# Altium PCB Linear Charge PCB.PcbDoc
Units mm, origin at the board's own origin, x right, y up, seen from the top; angles counter-clockwise.
Board outline 49.75 x 42.5 mm, 2 copper layers (Top Layer, Bottom Layer); 47 components, 40 nets, 177 pads, 33 vias.
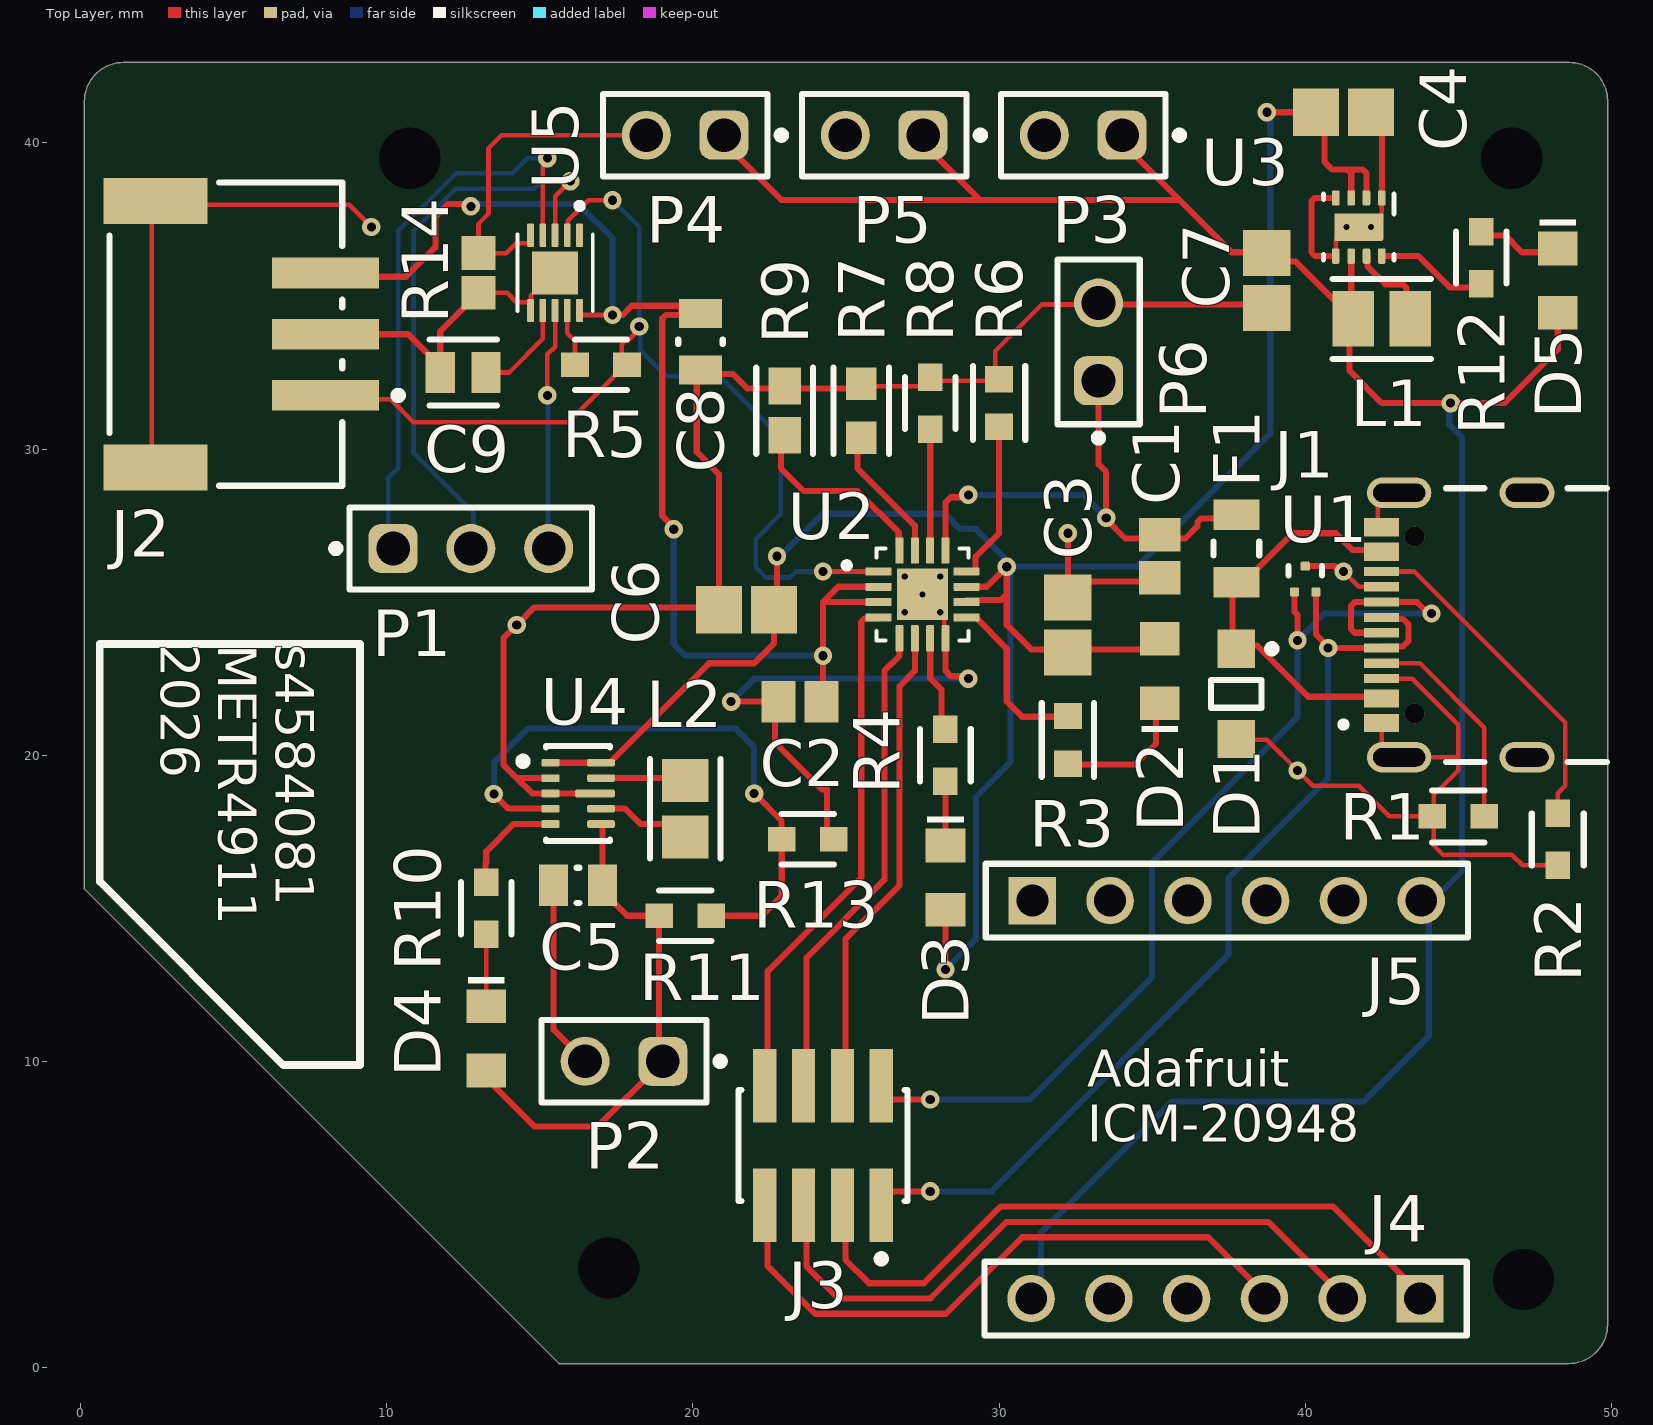
[diagram p0: Top Layer view]
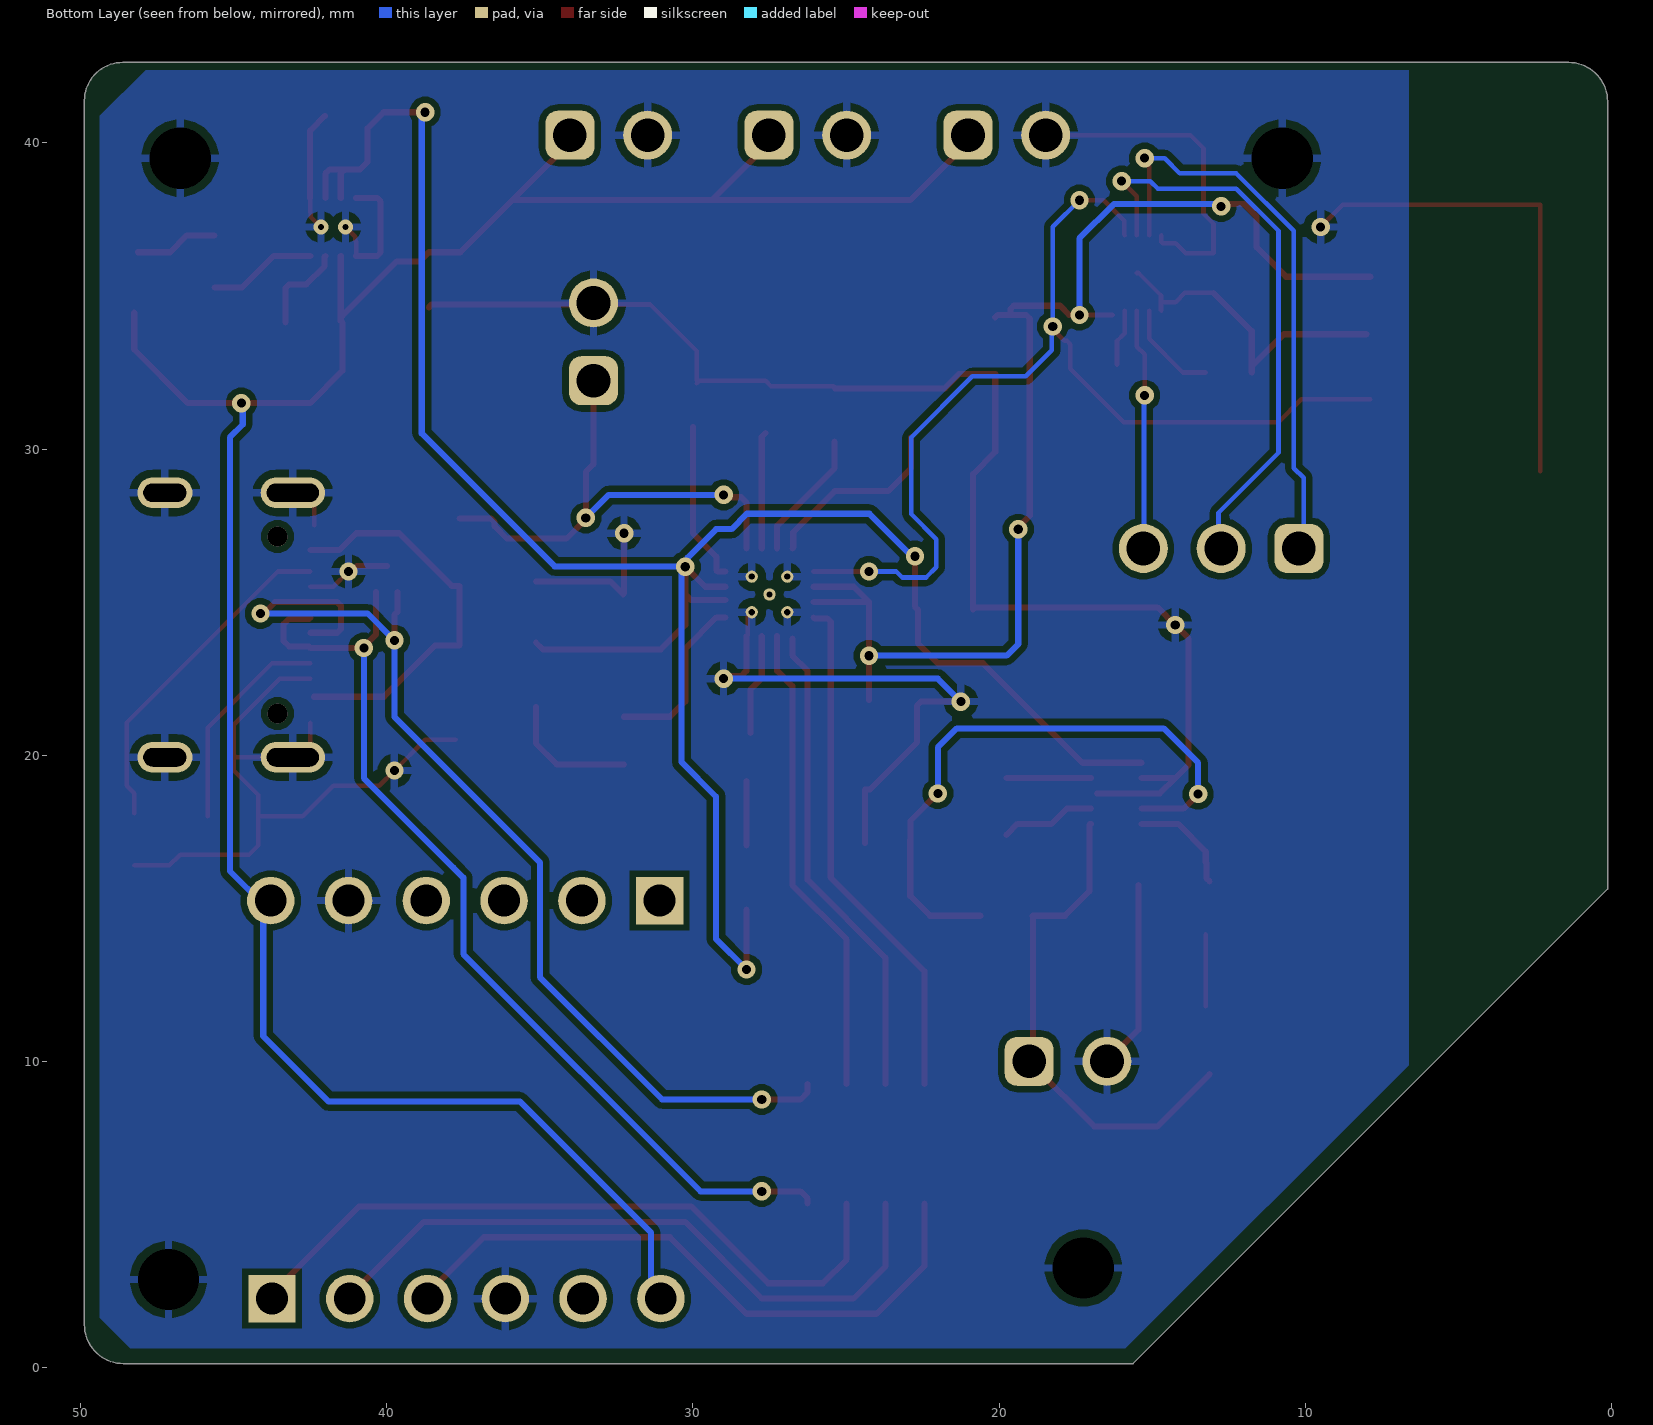
[diagram p1: Bottom Layer view, seen from below]
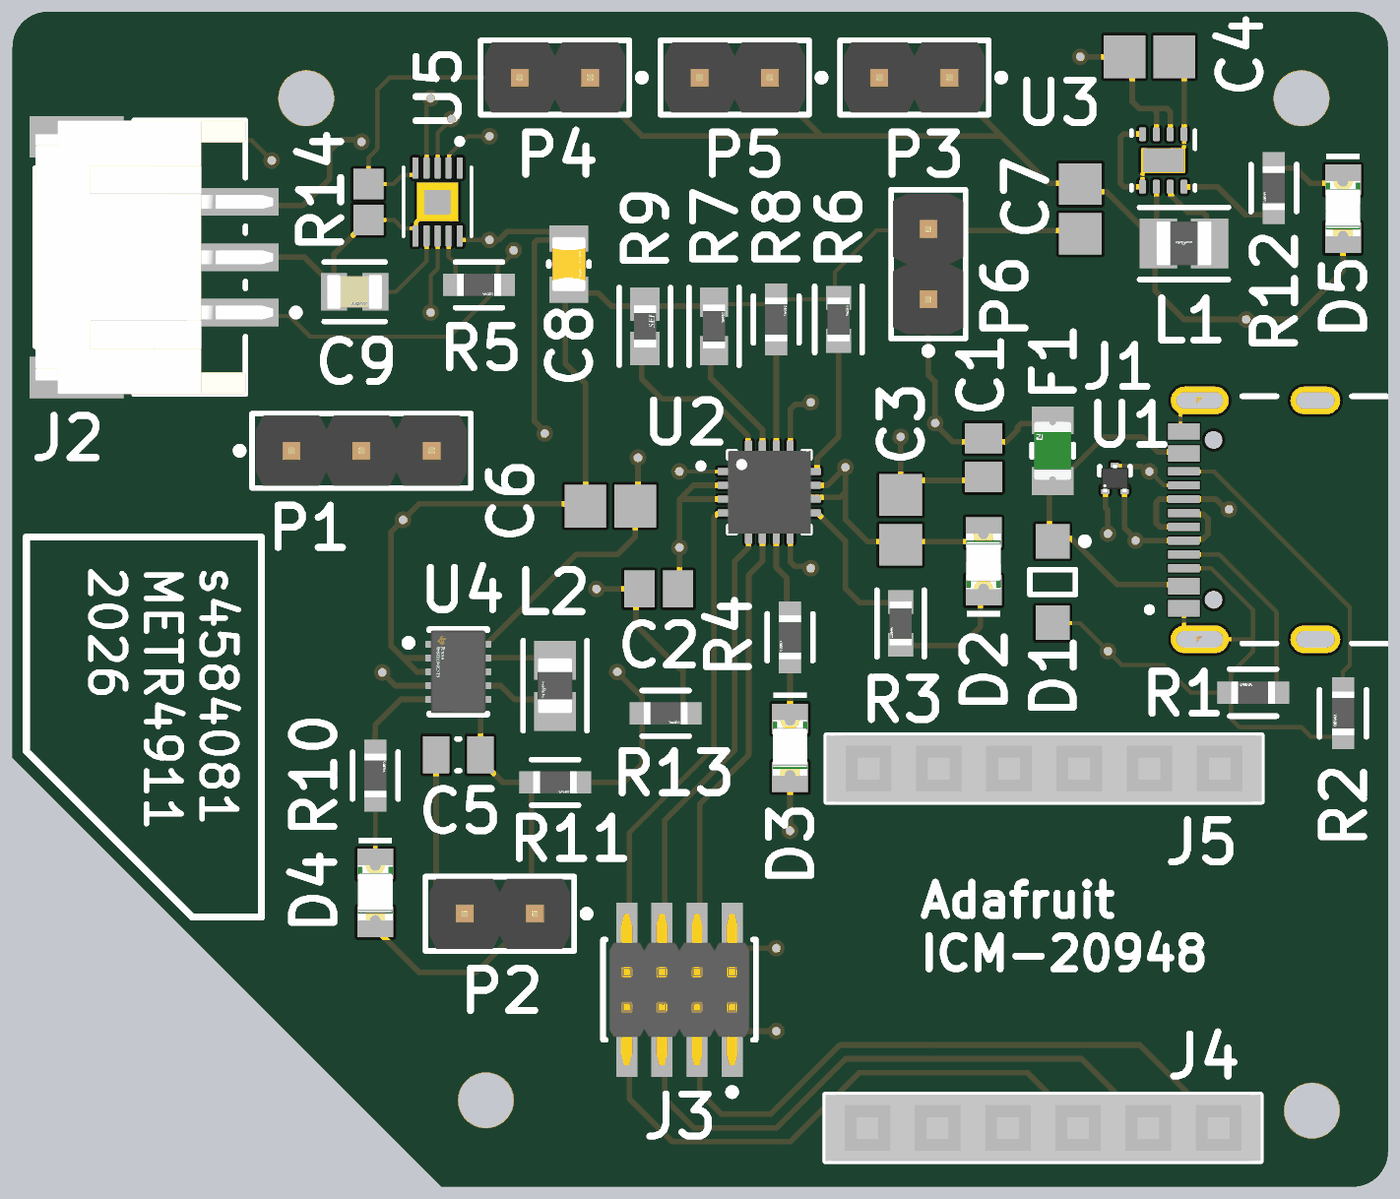
[diagram p2: 3D render of the assembled board from above, using the file's embedded part models]

## Layer stack, top to bottom
Top Solder: solder mask 0.0102, Solder Resist, Dk 3.5
Top Layer: signal copper 0.0356
Dielectric 1: dielectric 0.32, FR-4, Dk 4.8
Bottom Layer: signal copper 0.0356
Bottom Solder: solder mask 0.0102, Solder Resist, Dk 3.5

## Board outline
0.127,15.627 0.127,41.357 cw(c1.397,41.357) 1.397,42.627 48.627,42.627 cw(c48.627,41.377) 49.877,41.377 49.877,1.397 cw(c48.607,1.397) 48.607,0.127 15.627,0.127

## Design rules (kind name [scope] priority, off if disabled: settings)
Clearance [All] p1: gap=0.2 ignorepadtopadclearanceinfootprint=TRUE
HoleSize [IsVia] p1: absolutevalues=TRUE maxlimit=2.54 minlimit=0.025 maxpercent=80.000 minpercent=20.000
PolygonConnect [All] p1: connectstyle=Relief reliefconductorwidth=0.254 reliefentries=4 polygonreliefangle="90 Angle" airgapwidth=0.254
RoutingVias [All] p1: holewidth=0.3 width=0.4 viastyle="Through Hole" minholewidth=0.2 minwidth=0.3 maxholewidth=0.4 maxwidth=0.5
SilkToSolderMaskClearance [IsPad] p1: minsilkscreentomaskgap=0.2 clearancetoexposedcopper=TRUE
SolderMaskExpansion [All] p1: expansion=0.102 istentingtop=FALSE
Width [All] p1: maxlimit=0.2 minlimit=0.15 preferedwidth=0.2
28 further rules are at their usual default settings.

## Classes and differential pairs
component class "Voltage Regs": C4 C5 C6 C7 D4 D5 L1 L2 R10 R11 R12 R13 U3 U4
component class "IO Connections V1": D1 F1 J1 J2 J3 J4 J5 P1 P2 P3 P4 P5 P6 R1 R2 U1
component class "Charge Managment ICs": C1 C2 C3 C8 C9 D2 D3 R3 R4 R5 R6 R7 R8 R9 R14 U2 U5

## Components (designator, comment, footprint, x,y, rotation, side; value= is the part's Value field where it differs from the comment)
C1 "1uF 10% 0805" CAPC2013X100X50LL20T25 35.25,26.5 r270 top
C2 "1uF 10% 0805" CAPC2013X100X50LL20T25 23.5,21.75 r0 top
C3 "4.7uF 10% 0805" CAPC2013X145X50ML20T25 32.25,24.25 r270 top
C4 "10uF 10% 0805" CAPC2013X145X50ML20T25 41.25,41 r0 top
C5 "22uF 10% 0805" CAPC0805(2012)145_L 16.25,15.75 r180 top value=22uF
C6 "10uF 10% 0805" CAPC2013X145X50ML20T25 21.75,24.75 r0 top
C7 "10uF 10% 0805" CAPC2013X145X50ML20T25 38.75,35.5 r90 top
C8 "0.1uF 10% 0805" FP-AC0805-0_85-MFG 20.25,33.5 r90 top value="100 nF"
C9 "0.47uF 10% 0805" FP-C0805C-DN-MFG 12.5,32.5 r180 top value="0.47 μF"
D1 "SMF5.0AT1G" ONSC-SOD-123FL-2-498_V 37.75,22 r270 top
D2 "YELLOW 100mA 0805" WL-SMCW_0805_150080xx75000 35.25,22.75 r90 top
D3 "GREEN 100mA 0805" WL-SMCW_0805_150080xx75000 28.25,16 r270 top
D4 "RED 100mA 0805" WL-SMCW_0805_150080xx75000 13.25,10.75 r270 top
D5 "RED 100mA 0805" WL-SMCW_0805_150080xx75000 48.25,35.5 r270 top
F1 "0805L050WR" FP-0805L-MFG 37.75,26.75 r90 top value=0.15-0.85Ω
J1 "USB4105-GF-A" GCT_USB4105-GF-A 47.25,24.25 r90 top
J2 "S3B-PH-SM4-TB(LF)(SN)" FP-S3B-PH-SM4-TB_LF_SN-MFG 4.75,33.75 r90 top
J3 "20021121-00008C4LF" FP-20021121-00008C4LF-MFG 24.25,7.25 r180 top
J4 "SSW-106-02-T-S" SMTC-SSW-106-02-X-S 43.75,2.25 r180 top
J5 "SSW-106-02-T-S" SMTC-SSW-106-02-X-S 31.09,15.25 r0 top
L1 "2.2uH 20% 0805" FP-DFE2016CKA-IPC_A 42.5,34.25 r180 top
L2 "0.47uH 20% 0805" FP-LQM21PN_CH-w1_5-IPC_A 19.75,18.25 r270 top
P1 "61300311121" 61300311121 12.75,26.75 r0 top
P2 "61300211121" 61300211121 17.75,10 r180 top
P3 "61300211121" 61300211121 32.75,40.25 r180 top
P4 "61300211121" 61300211121 19.75,40.25 r180 top
P5 "61300211121" 61300211121 26.25,40.25 r180 top
P6 "61300211121" 61300211121 33.25,33.5 r90 top
R1 "5.1K 1% 0603" FP-AF0603-MFG 45,18 r180 top
R2 "5.1K 1% 0603" FP-AF0603-MFG 48.25,17.25 r270 top
R3 "30 Ohm 1% 0603" FP-AC0603-IPC_B 32.25,20.5 r270 top
R4 "18 Ohm 1% 0603" FP-AC0603-MFG 28.25,20 r270 top
R5 "10K 1% 0603" FP-AC0603-MFG 17,32.75 r0 top
R6 "1.1K 1% 0603" FP-AC0603-IPC_B 30,31.5 r90 top
R7 "2.94K 1% 0603" FP-AC0603-IPC_A 25.5,31.25 r90 top
R8 "56KΩ 1% 0603" FP-AC0603-MFG 27.75,31.5 r90 top
R9 "887 1% 0603" FP-RMCF0603-IPC_A 23,31.25 r90 top
R10 "18 Ohm 1% 0603" FP-AC0603-MFG 13.25,15 r90 top
R11 "66.5K 1% 0603" FP-AC0603-MFG 19.75,14.75 r0 top
R12 "13 Ohm 1% 0603" FP-AC0603-MFG 45.75,36.25 r270 top
R13 "10K 1% 0603" FP-AC0603-MFG 23.75,17.25 r0 top
R14 "20m 1% 0603" RESC1508X46X38ML25T25 13,35.75 r270 top
U1 "TPD2EUSB30DRTR" DRT0003A 40,25.75 r90 top
U2 "BQ24074RGTR" QFN50P300X300X100-17N 27.5,25.25 r0 top
U3 "TPS62162DSGT" DSG0008A_V 41.75,37.25 r270 top
U4 "TPS63802DLAR" FP-DLA0010A-MFG 16.25,18.75 r0 top
U5 "MAX17055ETB+T" SON40P200X250X80-11N 15.5,35.75 r270 top

## Footprints (in the part's own frame and the unit in brackets; to place one, negate y for a bottom-side part, rotate by r counter-clockwise, add the part's x,y. Pads: shape width x height; smd on the part's side, far side on the other; paste and mask are expansions set on the pad)
61300211121 [mm] "Pin Header, pitch 2.54 mm, THT, Vertical, single row, 2p"
  rrect50% 1.6x1.6 hole 1.1: 1(-1.27,0)
  round 1.6 hole 1.1: 2(1.27,0)
  silkscreen extent -3.26,-1.35 2.69,1.35, body extent -2.54,-1.27 2.54,1.27, height 8.57
61300311121 [mm] "Pin Header, pitch 2.54 mm, THT, Vertical, single row, 3p"
  rrect50% 1.6x1.6 hole 1.1: 1(-2.54,0)
  round 1.6 hole 1.1: 2(0,0) 3(2.54,0)
  silkscreen extent -4.53,-1.35 3.96,1.35, body extent -3.81,-1.27 3.81,1.27, height 8.57
CAPC0805(2012)145_L [mm] "Chip Capacitor, Body 2.0x1.2mm, Height 1.45mm, IPC High Density"
  rect 0.95x1.35 smd: 1(-0.8,0) 2(0.8,0)
  silkscreen extent -0.05,-0.58 0.05,0.58, body extent -1.1,-0.72 1.1,0.72, height 1.45
CAPC2013X100X50LL20T25 [mm] "Chip Capacitor, 2-Leads, Body 2.00x1.25mm, IPC High Density"
  rect 1.1x1.35 smd: 1(-0.7,0) 2(0.7,0)
  body extent -1.1,-0.72 1.1,0.72, height 1
CAPC2013X145X50ML20T25 [mm] "Chip Capacitor, 2-Leads, Body 2.00x1.25mm, IPC Low Density"
  rect 1.5x1.55 smd: 1(-0.9,0) 2(0.9,0)
  body extent -1.1,-0.72 1.1,0.72, height 1.45
DRT0003A [mm] "SOTFL, 3-Leads, Body 1x1mm (inc leads), Pitch 0.35mm"
  rrect33% 0.3x0.3 smd: 1(-0.425,0.35) 2(-0.425,-0.35) 3(0.425,0)
  silkscreen extent 0.13,-0.55 0.43,0.55, body extent -0.5,-0.5 0.5,0.5, height 0.5
DSG0008A_V [mm] "SON, 8-Leads, Body 2x2mm, Pitch 0.5mm, Thermal Pad 1.6x0.9mm, TI Recommended"
  rrect40% 0.5x0.25 smd: 1(-0.95,0.75) 2(-0.95,0.25) 3(-0.95,-0.25) 4(-0.95,-0.75) 5(0.95,-0.75) 6(0.95,-0.25) 7(0.95,0.25) 8(0.95,0.75)
  rrect11% 0.9x1.6 smd paste-0.45: 9(0,0)
  silkscreen extent -1.07,-1.15 1.07,1.15, body extent -1.05,-1.05 1.05,1.05, height 0.8
FP-0805L-MFG [mm]
  rect 1x1.5 smd paste+0 mask+0: 1(-1.1,0) 2(1.1,0)
  silkscreen extent -0.23,-0.75 0.23,0.75, body extent -1.7,-0.85 1.7,0.85, height 0.25
FP-20021121-00008C4LF-MFG [mm]
  rect 0.76x2.4 smd paste+0 mask+0: 1(-1.905,1.95) 2(-1.905,-1.95) 3(-0.635,1.95) 4(-0.635,-1.95) 5(0.635,1.95) 6(0.635,-1.95) 7(1.905,1.95) 8(1.905,-1.95)
  silkscreen extent -2.77,-1.82 2.77,3.82, body extent -2.87,-3.25 2.87,3.25, height 0.25
FP-AC0603-IPC_A [mm]
  rect 1.059x1.012 smd paste+0 mask+0: 1(-0.877,0) 2(0.877,0)
  silkscreen extent -1.41,-0.91 1.41,0.91, body extent -1.91,-1.01 1.91,1.01, height 0.25
FP-AC0603-IPC_B [mm]
  rect 0.859x0.912 smd paste+0 mask+0: 1(-0.777,0) 2(0.777,0)
  silkscreen extent -1.21,-0.86 1.21,0.86, body extent -1.46,-0.71 1.46,0.71, height 0.25
FP-AC0603-MFG [mm]
  rect 0.9x0.8 smd paste+0 mask+0: 1(-0.85,0) 2(0.85,0)
  silkscreen extent -0.85,-0.82 0.85,0.82, body extent -1.4,-0.55 1.4,0.55, height 0.25
FP-AC0805-0_85-MFG [mm]
  rect 0.95x1.4 smd paste+0 mask+0: 1(-0.925,0) 2(0.925,0)
  silkscreen extent -0.08,-0.72 0.08,0.72, body extent -1.6,-1.05 1.6,1.05, height 0.25
FP-AF0603-MFG [mm]
  rect 0.9x0.8 smd paste+0 mask+0: 1(-0.85,0) 2(0.85,0)
  silkscreen extent -0.85,-0.85 0.85,0.85, body extent -1.4,-0.55 1.4,0.55, height 0.25
FP-C0805C-DN-MFG [mm]
  rect 0.95x1.35 smd paste+0 mask+0: 1(-0.75,0) 2(0.75,0)
  silkscreen extent -1.1,-1.07 1.1,1.07, body extent -1.4,-0.85 1.4,0.85, height 0.25
FP-DFE2016CKA-IPC_A [mm]
  rect 1.358x1.812 smd paste+0 mask+0: 1(-0.927,0) 2(0.927,0)
  silkscreen extent -1.61,-1.31 1.61,1.31, body extent -2.11,-1.41 2.11,1.41, height 0.25
FP-DLA0010A-MFG [mm]
  rrect40% 0.6x0.25 smd paste+0 mask+0: 1(-0.9,1) 2(-0.9,0.5) 3(-0.9,0) 4(-0.9,-0.5) 5(-0.9,-1)
  rrect40% 0.9x0.25 smd paste+0 mask+0: 6(0.75,-1) 7(0.75,-0.5) 9(0.75,0.5) 10(0.75,1)
  rrect40% 1.3x0.25 smd paste-1000 mask+0: 8(0.55,0)
  silkscreen extent -1.92,-1.55 1.05,1.55, body extent -1.3,-1.65 1.3,1.65, height 0.25
FP-LQM21PN_CH-w1_5-IPC_A [mm]
  rect 1.406x1.508 smd paste+0 mask+0: 1(-0.926,0) 2(0.926,0)
  silkscreen extent -1.63,-1.15 1.63,1.15, body extent -2.13,-1.25 2.13,1.25, height 0.25
FP-RMCF0603-IPC_A [mm]
  rect 1.206x1.058 smd paste+0 mask+0: 1(-0.801,0) 2(0.801,0)
  silkscreen extent -1.4,-0.93 1.4,0.93, body extent -1.9,-1.03 1.9,1.03, height 0.25
FP-S3B-PH-SM4-TB_LF_SN-MFG [mm]
  rect 1x3.5 smd paste+0 mask+0: 1(-2,-3.25) 2(0,-3.25) 3(2,-3.25)
  rect 1.5x3.4 smd paste+0 mask+0: 4(-4.35,2.3) 5(4.35,2.3)
  silkscreen extent -4.95,-5.75 4.95,3.8, body extent -5.2,-5.1 5.2,4.1, height 0.25
GCT_USB4105-GF-A [mm]
  rect 0.6x1.15 smd mask+0.05: A1_B12(-3.2,4.755) A4_B9(-2.4,4.755) B1_A12(3.2,4.755) B4_A9(2.4,4.755)
  rect 0.3x1.15 smd mask+0.05: A5(-1.25,4.755) A6(-0.25,4.755) A7(0.25,4.755) A8(1.25,4.755) B5(1.75,4.755) B6(0.75,4.755) B7(-0.75,4.755) B8(-1.75,4.755)
  oval 1x2.1 hole 0.6 slot 1.7 at 90 deg: SH1(-4.32,4.18) SH2(4.32,4.18)
  oval 1x1.8 hole 0.6 slot 1.4 at 90 deg: SH3(-4.32,0) SH4(4.32,0)
  round 0.65 hole 0.65 unplated: ""(-2.89,3.68) ""(2.89,3.68)
  silkscreen extent -4.47,-2.6 4.47,6.1
ONSC-SOD-123FL-2-498_V [mm] "SOD, 2-Leads, Body 2.7x1.65mm"
  rect 1.25x1.22 smd: 1(-1.475,0) 2(1.475,0)
  silkscreen extent -1.6,-0.82 0.45,1.29, body extent -1.35,-0.82 1.35,0.82, height 0.98
QFN50P300X300X100-17N [mm]
  rrect25% 0.86x0.26 smd: 1(-1.435,0.75) 2(-1.435,0.25) 3(-1.435,-0.25) 4(-1.435,-0.75) 9(1.435,-0.75) 10(1.435,-0.25) 11(1.435,0.25) 12(1.435,0.75)
  rrect25% 0.26x0.86 smd: 5(-0.75,-1.435) 6(-0.25,-1.435) 7(0.25,-1.435) 8(0.75,-1.435) 13(0.75,1.435) 14(0.25,1.435) 15(-0.25,1.435) 16(-0.75,1.435)
  rect 1.68x1.68 smd paste-0.31: 17(0,0)
  round 0.4 hole 0.2 mask+0: 18(0,0) 19(-0.58,0.58) 20(0.58,0.58) 21(-0.58,-0.58) 22(0.58,-0.58)
  silkscreen extent -2.57,-1.5 1.5,1.5, body extent -1.5,-1.5 1.5,1.5, height 1
RESC1508X46X38ML25T25 [mm] "Chip Resistor, 2-Leads, Body 1.52x0.76mm, IPC Low Density"
  rect 1.1x1.1 smd: 1(-0.65,0) 2(0.65,0)
  body extent -0.89,-0.51 0.88,0.5, height 0.46
SMTC-SSW-106-02-X-S [mm] "SQ Post Socket, 1x6 Pins, Vertical, 2.54mm Pitch, Female"
  rect 1.55x1.55 hole 1.04: 1(0,0)
  round 1.55 hole 1.04: 2(2.54,0) 3(5.08,0) 4(7.62,0) 5(10.16,0) 6(12.7,0)
  silkscreen extent -1.53,-1.2 14.23,1.2, body extent -1.52,-1.21 14.22,1.21, height 8.51
SON40P200X250X80-11N [mm]
  rrect25% 0.76x0.22 smd: 1(-1.23,0.8) 2(-1.23,0.4) 3(-1.23,0) 4(-1.23,-0.4) 5(-1.23,-0.8) 6(1.23,-0.8) 7(1.23,-0.4) 8(1.23,0) 9(1.23,0.4) 10(1.23,0.8)
  rect 1.4x1.5 smd paste-2: 11(0,0)
  silkscreen extent -2.29,-1.23 1.25,1.23
WL-SMCW_0805_150080xx75000 [mm] "SMD Mono-color Chip LED, body 2.0x1.25mm"
  rect 1.1x1.3 smd: 1(-1.05,0) 2(1.05,0)
  silkscreen extent -2,-0.6 -1.8,0.6, body extent -1,-0.63 1,0.62, height 0.7

## Part data
C1 C2: library part CMP-1036-04732-2, Manufacturer=Kemet, Part Number=C0805C105K9RACTU
C3: library part CMP-2007-01048-1, Manufacturer=Kemet, Part Number=C0805C475K4RACTU
C4 C6 C7: library part CMP-2007-01044-1, Manufacturer=Kemet, Part Number=C0805C106K8RACTU
C5: library part CMP-1036-04938-1, "CAP 22uF 6.3V ±10% 0805 (2012 Metric) Thickness 1.45mm SMD", Case-EIA=0805, Case-Metric=2012, Rated Voltage="6.3 V", Tolerance=Â±10%, Max Thickness="1.45 mm", Technology=SMT
C8: library part CMP-03422-000831-1, "AC0805 100 nF X7R 10.00% 50 V", Capacitance="100 nF", Manufacturer=Yageo, Manufacturer Part Number=AC0805KKX7R9BB104, Package=AC0805-0.85, Temperature="-55°C to +125°C", Temperature Characteristic=X7R, Temperature Coefficient=15%, Temperature Range High=+125°C, Temperature Range Low=-55°C, Tolerance=0.1, Voltage Rating="50 V", Automotive=Yes, Automotive Grade="Grade 1", Category=Cap, ComponentLink2Description=Datasheet, ComponentLink2URL=http://www.yageo.com/documents/recent/UPY-AC_NP0X7R_16V-to-630V_12.pdf, Device Class L1="Passive Components", Device Class L2=Capacitors, Device Class L3="Ceramic Capacitors", Footprint Url=http://www.yageo.com/exep/pages/download/literatures/UPY-C_GEN_24.pdf, Height=0.95mm, Ipc Land Pattern Name=CAPC200125X85, Lead Free=Yes, Material=Ceramic, Octopart=https://octopart.com/ac0805kkx7r9bb104-yageo-90326560, RoHS=TRUE
C9: library part CMP-1036-04645-2, "CAP CER 0.47UF 25V X7R 0805", Capacitance="0.47 μF", Manufacturer=KEMET, Manufacturer Part Number=C0805C474K3RACTU, Package=C0805C-DN, Temperature="-55°C to +125°C", Temperature Characteristic=X7R, Temperature Coefficient=30ppm/°C, Temperature Range High=+125°C, Temperature Range Low=-55°C, Tolerance=0.1, Voltage Rating="25 V", Automotive=No, Category=Cap, ComponentLink2Description=Datasheet, ComponentLink2URL=https://content.kemet.com/datasheets/KEM_C1003_C0G_SMD.pdf, Device Class L1="Passive Components", Device Class L2=Capacitors, Device Class L3="Ceramic Capacitors", Digikey Description="CAP CER 0.47UF 25V X7R 0805", Height=0.88mm, Ipc Land Pattern Name=CAPC200125X78, Lead Free=Yes, Material=Ceramic, Octopart=https://octopart.com/c0805c474k3ractu-kemet-90785, RoHS=TRUE
D1: library part CMP-1061-00612-1, "200 W Transient Voltage Suppressor, 2-Pin SOD-123FL, Pb-Free, Tape and Reel", Manufacturer="On Semiconductor", ComponentLink1Description="Manufacturer URL", ComponentLink1URL=http://www.onsemi.com/, ComponentLink2Description=Datasheet, ComponentLink2URL=http://www.onsemi.com/pub_link/Collateral/SMF5.0AT1-D.PDF, ComponentLink3Description="Package Specification", ComponentLink3URL=http://www.onsemi.com/pub_link/Collateral/498-01.PDF, DatasheetVersion="Rev. 7", Direction=Unidirectional, IR Max (uA)=400, Mounting Technology="Surface Mount", PackageDescription="2-Pin SOD, Body 1.65 x 2.7 mm", PackageReference=SOD-123FL-2-498, PackageVersion="Rev. D, 05/2013", Packing="Tape and Reel", PartNumber=SMF5.0AT1G, RoHS=Pb-Free, V(BR) Typ (V)=6.7
D2: library part CMP-1426-00012-4, "2 V Yellow LED 2012 (0805) SMD, Wurth Elektronik WL-SMCW 150080YS75000", Case Code (Imperial)=0805, Case Code (Metric)=2012, Color=Yellow, Forward Current=100mA, Forward Voltage=2V, Manufacturer Lifecycle Status=ACTIVE, Manufacturer Package Identifier="0805 (2012 metric)", Max Junction Temperature (Tj)=95°C, Max Operating Temperature=85°C, Max Reverse Voltage (DC)=5V, Min Operating Temperature=-40°C, Power Dissipation=72mW, Test Current=20mA, Case/Package=0805, Dominant Wavelength=590nm, Height=700µm, Length=2mm, Lens Style="Clear, Rectangular", Lifecycle Status=Production, Luminous Intensity=120mcd, Mount="Surface Mount", Packaging="Tape and Reel", Peak Wavelength=595nm, REACH SVHC=Unknown, Reverse Voltage=5V, RoHS=Compliant, Viewing Angle=140°, Wavelength=590nm, Width=1.25mm, YEOL="1 = Estimated lifetime > 10 years"
D3: library part CMP-1426-00007-4, "WURTH ELEKTRONIK - 150080GS75000 - LED, Green, SMD, 0805, 30 mA, 3.2 V, 520 nm", Case Code (Imperial)=0805, Case Code (Metric)=2012, Color=Green, Forward Current=100mA, Forward Voltage=3.2V, Manufacturer Lifecycle Status=ACTIVE, Manufacturer Package Identifier="0805 (2012 metric)", Max Junction Temperature (Tj)=95°C, Max Operating Temperature=85°C, Max Reverse Voltage (DC)=5V, Min Operating Temperature=-40°C, Power Dissipation=105mW, Test Current=20mA, Case/Package=0805, Dominant Wavelength=525nm, Height=700µm, Length=2mm, Lens Style="Clear, Rectangular", Lifecycle Status=Production, Luminous Intensity=450mcd, Mount="Surface Mount", Packaging="Tape and Reel", Peak Wavelength=515nm, REACH SVHC=Unknown, Reverse Voltage=5V, RoHS=Compliant, Viewing Angle=140°, Wavelength=525nm, Width=1.25mm, YEOL="1 = Estimated lifetime > 10 years"
D4 D5: library part CMP-1426-00011-4, "LED Uni-Color Red 630nm 2-Pin Chip 0805(2012Metric) T/R", Case Code (Imperial)=0805, Case Code (Metric)=2012, Color=Red, Forward Current=100mA, Forward Voltage=2V, Manufacturer Lifecycle Status=ACTIVE, Manufacturer Package Identifier="0805 (2012 metric)", Max Junction Temperature (Tj)=95°C, Max Operating Temperature=85°C, Max Reverse Voltage (DC)=5V, Min Operating Temperature=-40°C, Power Dissipation=72mW, Test Current=20mA, Case/Package=0805, Dominant Wavelength=625nm, Height=700µm, Length=2mm, Lens Style="Clear, Rectangular", Lifecycle Status=Production, Luminous Intensity=150mcd, Mount="Surface Mount", Packaging="Tape and Reel", Peak Wavelength=630nm, REACH SVHC=Unknown, RoHS=Compliant, Viewing Angle=140°, Wavelength=625nm, Width=1.25mm, YEOL="1 = Estimated lifetime > 10 years"
F1: library part CMP-08606-000023-1, "PTC RESET FUSE 6V 500MA 0805", Ambient Temperature Range High=+85°C, Ambient Temperature Range Low=-40°C, Current Rating=100A, Hold Current=0.5A, Manufacturer="Littelfuse Inc.", Package=0805L, Resistance=0.15-0.85Ω, Temperature="-40°C to +85°C", Trip Current=1A, Voltage Rating=6V, Automotive=No, Category=Fuse, ComponentLink2Description=Datasheet, ComponentLink2URL=https://www.littelfuse.com/~/media/electronics/datasheets/resettable_ptcs/littelfuse_ptc_0805l_datasheet.pdf.pdf, Device Class L1="Circuit Protection", Device Class L2="PTC Resettable Fuses", Device Class L3=unset, Digikey Description="PTC RESET FUSE 6V 500MA 0805", Height=1.25mm, Lead Free=Yes, Manufacturer Part Number=0805L050WR, Mouser Description="PTC Resettable Fuse 0.5A(hold) 1A(trip) 6VDC 100A 0.5W 0.1s 0.15Ohm SMD Solder Pad 0805 T/R", Octopart=https://octopart.com/0805l050wr-littelfuse-673858, RoHS=TRUE, Temperature Range High=+85°C, Temperature Range Low=-40°C, Trip Time=0.1s
J1: Package=None, Availability=Unavailable, MF="{'manufacturer': u'GCT'}", MP=USB4105-GF-A, Price=None
J2: library part CMP-2000-07023-2, "CONN HEADER SMD R/A 3POS 2MM", Color=Natural, Contact Resistance=10mR, Current Rating=2A, Flammability Rating="UL94 V-0", Housing Color=Beige, Insulation Resistance=1GR, Max Operating Temperature=85°C, Max Voltage Rating (AC)=100V, Min Operating Temperature=-25°C, Connector Type=Header, Contact Finish - Mating=TIN, Contact Material="Copper Alloy", Contact Mating Length=0.13inch, Contact Plating=Tin, Contact Shape=Square, Contact Type="Male Pin", Depth=7.6mm, Fastening Type=Detent, Gender=Male, Height=9.4mm, Housing Material=Polyamide, Insulation Color=Natural, Insulation Material=Nylon, Lead Free="Lead Free", Lead Pitch=2mm, Length=9.9mm, Material=Polyamide, Max Current Rating=2A, Max Voltage Rating (DC)=100V, Mount="Surface Mount", Number of Contacts=3, Number of Poles=3, Number of Positions=3, Number of Rows=1, Orientation="Right Angle", Packaging="Tape and Reel", Pitch=2mm, REACH SVHC="No SVHC", Series=PH, Termination=Solder, Voltage Rating=100V, Voltage Rating (AC)=100V, Width=5mm, Working Voltage=100V
J3: library part CMP-15126-126517167-1, "20021121-00008C4LF Conn Unshrouded Header HDR 8 POS 1.27mm Solder ST Top Entry SMD Minitek127® T/R", Color=Black, Contact Resistance=30mΩ, Current Rating=1A, Max Operating Temperature=85°C, Max Voltage Rating (AC)=125V, Min Operating Temperature=-55°C, Connector Type="Header, Male Pin", Contact Material=Copper, Contact Mating Length=3.048mm, Contact Plating=Gold, Depth=3.4mm, Gender=Male, Height=5.05mm, Housing Color=Black, Housing Material=Thermoplastic, Length=5.08mm, Mating Post Length=3.05mm, Mount="Surface Mount", NexarPartId=126517167, Number of Contacts=8, Number of Pins=8, Number of Positions=8, Number of Rows=2, Orientation=Straight, Pitch=1.27mm, REACH SVHC="No SVHC", RoHS=Compliant, Row Spacing=1.27mm, Stack Height=3mm, Termination=Solder, Voltage Rating=125V
J4 J5: library part CMP-1023-00360-1, "SQ Post Socket, Through-hole, Vertical, -55 to 105 degC, 2.54mm Pitch, 6-Pin, Female, RoHS", Manufacturer=Samtec, Temperature Range="-55 to 105 degC", ComponentLink1Description="Manufacturer URL", ComponentLink1URL=http://www.samtec.com, ComponentLink2Description=Datasheet, ComponentLink2URL=http://www.samtec.com/documents/webfiles/pdf/SSW_TH.PDF, ComponentLink3Description="Package Specification", ComponentLink3URL=http://www.samtec.com/documents/webfiles/cpdf/SSW-1XX-XX-XXX-X-XX-XXX-XX-MKT.pdf, DatasheetVersion=F-214, Mounting Technology=Through-hole, Orientation=Vertical, PackageDescription="Assembly, Socket Strip .016 X .031 Tail", PackageReference=SSW-106-02-X-S, PackageVersion="CA, 6/1987", PartNumber=SSW-106-02-T-S, Pitch="2.54 mm", RoHS=True
L1: library part CMP-06042-016665-1, "Chip Inductors Wirewound Metal Alloy Shielding 0806 Package 2.2uH 20% 1MHz"
L2: library part CMP-06042-016314-1, "Multilayer Type Inductor for Power Lines, 2012, 0.47μH, 20%, 0.138Ω, 1.8A", RoHS Compliant=Yes
P1: library part CMP-1502-01062-4, "THT Vertical Pin Header WR-PHD, Pitch 2.54 mm, Single Row, 3 pins", Color=Black, Contact Resistance=20mΩ, Current Rating=3A, Max Operating Temperature=105°C, Min Operating Temperature=-40°C, Operating Supply Voltage=250V, Connector Type="Male Pin", Contact Material=Gold, Contact Mating Length=5.9944mm, Contact Plating=Gold, Gender=Male, Height=8.94mm, Lead Free="Lead Free", Lead Pitch=2.54mm, Mount="Through Hole", Number of Contacts=3, Number of Pins=3, Number of Positions=3, Number of Rows=1, Orientation=Vertical, Packaging=Bulk, Pitch=2.54mm, RoHS=Compliant, Termination=Solder, Voltage Rating=250V
P2 P3 P4 P5 P6: library part CMP-1712-00002-7, "THT Vertical Pin Header WR-PHD, Pitch 2.54 mm, Single Row, 2 pins", Color=Black, Contact Resistance=20mΩ, Current Rating=3A, Max Operating Temperature=105°C, Min Operating Temperature=-40°C, Operating Supply Voltage=250V, Connector Type="Male Pin", Contact Gender=Male, Contact Material=Gold, Contact Mating Length=5.9944mm, Contact Plating=Gold, Gender=Male, Height=8.94mm, Housing Material=PBT, Lead Free="Lead Free", Lead Pitch=2.54mm, Mount="Through Hole", Number of Contacts=2, Number of Pins=2, Number of Positions=2, Number of Rows=1, Orientation=Vertical, Packaging=Bulk, Pitch=2.54mm, REACH SVHC=No, RoHS=Compliant, Termination="Through Hole", Voltage Rating=250V
R1 R2: library part CMP-03412-041991-1, "Anti-Sulfurated Chip Resistors Automotive Grade 5.1kΩ 1% 100ppm/°C 0603", Case/Package=0603, Max Operating Temperature=155°C, Max Power Dissipation=100mW, Min Operating Temperature=-55°C, Resistance=5.1kR, Resistor Type="Thick Film", Temperature Coefficient=100ppm/°C, Tolerance=1%, Features="Moisture Resistant", Height=0.022inch, Length=0.063inch, Number of Terminations=2, Packaging="Tape and Reel", RoHS Compliant=Yes, Series=AF, Width=0.031inch
R3: library part CMP-03412-028950-2, "RES 30Ω 1.00% 0.1W 0603", Case/Package=0603, Max Operating Temperature=155°C, Max Power Dissipation=100mW, Min Operating Temperature=-55°C, Resistance=30R, Resistor Type="Thick Film", Temperature Coefficient=100ppm/°C, Tolerance=1%, Features="Moisture Resistant", Height=0.022inch, Length=0.063inch, Number of Terminations=2, Packaging="Tape and Reel", RoHS Compliant=Yes, Series=AC, Width=0.031inch
R4 R10: library part CMP-03412-005942-2, "RES 18Ω 1.00% 0.1W 0603", Case/Package=0603, Max Operating Temperature=155°C, Max Power Dissipation=100mW, Min Operating Temperature=-55°C, Resistance=18R, Resistor Type="Thick Film", Temperature Coefficient=100ppm/°C, Tolerance=1%, Depth=0.8mm, Features="Moisture Resistant", Height=0.022inch, Length=0.063inch, Military Standard=Not, Number of Terminations=2, Packaging="Tape and Reel", RoHS Compliant=Yes, Series=AC, Width=0.031inch
R5: library part CMP-03412-038110-1, "RES 10.5KΩ 1.00% 0.1W 0603", RoHS Compliant=Yes
R6: library part CMP-03412-029129-2, "RES 1.1KΩ 1.00% 0.1W 0603", Case Code (Imperial)=0603, Case Code (Metric)=1608, Max Operating Temperature=155°C, Max Power Dissipation=100mW, Min Operating Temperature=-55°C, Resistance=1.1kR, Resistor Type="Thick Film", Temperature Coefficient=100ppm/°C, Tolerance=1%, Voltage Rating=50V, Case/Package=0603, Features="Moisture Resistant", Height=0.022inch, Length=0.063inch, Number of Terminations=2, Packaging="Tape and Reel", Power Rating=100mW, RoHS Compliant=Yes, Series=AC, Termination=SMD/SMT, Width=0.8mm
R7: library part CMP-03412-000673-2, "RES 2.94KΩ 1.00% 0.1W 0603", Case Code (Imperial)=0603, Case Code (Metric)=1608, Max Operating Temperature=155°C, Max Power Dissipation=100mW, Min Operating Temperature=-55°C, Resistance=2.94kR, Resistor Type="Thick Film", Temperature Coefficient=100ppm/°C, Tolerance=1%, Voltage Rating=50V, Case/Package=0603, Features="Moisture Resistant", Height=0.022inch, Length=0.063inch, Number of Terminations=2, Packaging="Tape and Reel", Power Rating=100mW, RoHS Compliant=Yes, Series=AC, Termination=SMD/SMT, Weight=7.1E-05oz, Width=0.8mm
R8: library part CMP-03412-027575-2, "RES 56KΩ 1.00% 0.1W 0603", RoHS Compliant=Yes
R9: library part CMP-26527-006687-1, "887kΩ ±1% 0.1W 0603 Thick Film Chip Resistor AEC-Q200 compliant", Case/Package=0603, Max Operating Temperature=155°C, Min Operating Temperature=-55°C, Resistance=887kR, Resistor Type="Thick Film", Temperature Coefficient=100ppm/°C, Tolerance=1%, Contact Plating=Tin, Mount="Surface Mount", Packaging="Tape and Reel", Radiation Hardening=No, RoHS Compliant=Yes
R11: library part CMP-03412-000604-2, "RES 66.5KΩ 1.00% 0.1W 0603", Case Code (Imperial)=0603, Case Code (Metric)=1608, Max Operating Temperature=155°C, Max Power Dissipation=100mW, Min Operating Temperature=-55°C, Ratings=AEC-Q200, Resistance=66.5kR, Resistor Type="Thick Film", Temperature Coefficient=100ppm/°C, Tolerance=1%, Voltage Rating=50V, Case/Package=0603, Features="Moisture Resistant", Height=0.45mm, Length=1.6mm, Number of Terminations=2, Packaging="Tape and Reel", Power Rating=100mW, RoHS Compliant=Yes, Series=AC, Termination=SMD/SMT, Weight=7.1E-05oz, Width=0.8mm
R12: library part CMP-03412-014777-2, "RES 13Ω 1.00% 0.1W 0603", Case/Package=0603, Max Operating Temperature=155°C, Max Power Dissipation=100mW, Min Operating Temperature=-55°C, Resistance=13R, Resistor Type="Thick Film", Temperature Coefficient=100ppm/°C, Tolerance=1%, Features="Moisture Resistant", Height=0.022inch, Length=0.063inch, Number of Terminations=2, Packaging="Tape and Reel", RoHS Compliant=Yes, Series=AC, Width=0.031inch
R13: library part CMP-03412-038553-1, "RES 10kΩ 1.00% 0.2W 0603"
R14: library part CMP-2000-03802-1, Manufacturer="Vishay Dale", Part Number=WSL0603R0200FEA
U1: library part CMP-0326-00046-3, "ESD Solution for Super-Speed (6 Gbps) USB 3.0 Interface, 2 Channels, -40 to +85 degC, 3-pin SOT (DRT), Green (Rohs & No Sb/Br)", Breakdown Voltage(Min)(V)=9, Differential Capacitance(pF)=0.01, IO Capacitance(Typ)(pF)=0.7, IO Leakage Current(nA)=10, Manufacturer="Texas Instruments", 1394 / Firewire=TRUE, ComponentLink1Description=Datasheet, ComponentLink1URL=http://www.ti.com/general/docs/lit/getliterature.tsp?genericPartNumber=TPD2EUSB30&fileType=pdf, ComponentLink2Description="URL Link1", ComponentLink2URL=SamplesURL:http://www.ti.com/product/tpd2eusb30#samples, DatasheetVersion=SLVSAC2C, Eco-Plan="Green (RoHS & no Sb/Br)", HDMI=TRUE, IEC 61000-4-2 Air-Gap(+/- kV)=8, IEC 61000-4-2 Contact(+/- kV)=8, Mounting Technology="Surface Mount", PackageDescription="3-Flat Lead Plastic Small Outline, 1 x 1 mm (inc leads), 0.35 mm Pitch", PackageReference=DRT0003A, PackageVersion="revD, Jun-2008", PartNumber=TPD2EUSB30DRTR, Serial ATA / eSATA=TRUE, SubFamily="ESD Solution", USB Full Speed=TRUE, USB High Speed=TRUE, USB Super Speed=TRUE
U2: "Standalone 1-cell 1.5-A linear battery charger, Power Path, 4.2-V VBAT, 10.5-V OVP and 4.4-V VOUT", Package="VQFN-16 Texas Instruments", Check_prices=https://www.snapeda.com/parts/BQ24074RGTR/Texas+Instruments/view-part/?ref=eda, MF="Texas Instruments", MP=BQ24074RGTR, SnapEDA_Link=https://www.snapeda.com/parts/BQ24074RGTR/Texas+Instruments/view-part/?ref=snap
U3: library part CMP-0323-00319-3, "Buck Step Down Regulator with 3 to 17 V Input and 3.3 V Output, -40 to 85 degC, 8-Pin WSON (DSG), Green (RoHS & no Sb/Br)", Manufacturer="Texas Instruments", Rating=Catalog, Switch Current Limit(Typ)(A)=1.8, Code_JEDEC=MO-229, ComponentLink1Description=Datasheet, ComponentLink1URL=http://www.ti.com/general/docs/lit/getliterature.tsp?genericPartNumber=TPS62162&fileType=pdf, ComponentLink2Description="Package Specification", ComponentLink2URL=http://www.ti.com/litv/pdf/mpds308a, ComponentLink3Description="URL Link1", ComponentLink3URL="Samples URL:http://www.ti.com/product/tps54611#samples", DatasheetVersion=SLVSAM2A, Duty Cycle(Max)(%)=100, Eco-Plan="Green (RoHS & no Sb/Br)", Iout(Max)(A)=1, Iq(Typ)(mA)=0.017, Mounting Technology="Surface Mount", PackageDescription="8-Pin Plastic Small Outline No-Lead, 2 x 2 x 0.8 mm Body, 0.5 mm Pitch, Exposed Pad", PackageReference=DSG0008A, PackageVersion="revB, Oct-2010", PartNumber=TPS62162DSGT, Preset Vout(V)=3.3, Regulated Outputs(#)=1, SubFamily="Step-Down Regulator", Synchronous Rectification=TRUE, Topology=Buck, Vin(Max)(V)=17, Vin(Min)(V)=3, Vout(Max)(V)=3.3, Vout(Min)(V)=3.3
U4: library part CMP-04918-000005-1, "IC POWER MANAGEMENT", Manufacturer="Texas Instruments", Max Junction Temp=+125°C, Max Supply Voltage=5.5V, Min Supply Voltage=1.3V, Nominal Supply Current=11uA, Output Current=2A, Output Voltage=1.8-5.2V, Package=DLA0010A, Switching Frequency=1.4/1.6/2.1MHz, Temperature="-40°C to +125°C", Temperature Range Low=-40°C, Automotive=No, Category=IC, ComponentLink2Description=Datasheet, ComponentLink2URL=https://www.ti.com/lit/ds/symlink/tps63802.pdf, Device Class L1="Integrated Circuits (ICs)", Device Class L2="Power Management ICs", Device Class L3="Voltage Regulators - Switching", Digikey Description="IC POWER MANAGEMENT", Height=1mm, Lead Free=Yes, Manufacturer Part Number=TPS63802DLAR, Max Duty Cycle=100%, Mouser Description="2-A, high-efficient, 11-µA quiescent current buck-boost converter in QFN/DFN package 10-VSON-HR -40 to 125", Number Of Outputs=1, Octopart=https://octopart.com/tps63802dlar-texas+instruments-97359678, Output Type=AdjustableProgrammable, RoHS=TRUE, Standoff Height=0mm, Switching Topology=Buck-Boost, Temperature Range High=+125°C
U5: "Battery Battery Monitor IC Multi-Chemistry 10-TDFN (2.5x2)", Package=None, Availability="In Stock", Check_prices=https://www.snapeda.com/parts/MAX17055ETB+T/Maxim+Integrated/view-part/?ref=eda, MF="Maxim Integrated Products", MP=MAX17055ETB+T, Price=None, Purchase-URL=https://pricing.snapeda.com/search/part/MAX17055ETB+T/?ref=eda, SnapEDA_Link=https://www.snapeda.com/parts/MAX17055ETB+T/Maxim+Integrated/view-part/?ref=snap

## Free pads (board coordinates)
  round 1.524 hole 2: 3(47.127,2.877) 6(46.75,39.5) 7(10.75,39.5) MNT(17.25,3.25)

## Via types
v1: diameter 0.6, hole 0.3, Top Layer to Bottom Layer, 31 vias
v2: diameter 0.5, hole 0.2, Top Layer to Bottom Layer, 2 vias

## Nets (pads, with @x,y where several pads share a name; then routed paths per layer and width w, separated by ;. In a path a pad name is that pad's centre, name@x,y a point inside that pad or via, vN(x,y) a via of type N, cw(c..) or ccw(c..) an arc to the next point about the centre after c; other vN are vias at no path point)
3V3: C7.2 D5.2 J4.6 J5.6 L1.2 P3.1 P4.1 P5.1 U3.6 | length 79.8
  Top Layer w0.2: P4.1@21.387,39.637 22.897,38.127 29.387,38.127 ; P5.1@27.397,40.127 27.397,40.117 29.387,38.127 ; P3.1@33.897,40.127 33.981,40.127 34.535,39.573 34.535,39.489 37.597,36.427 38.627,36.427 38.927,36.127 39.677,36.127 L1.2@41.45,34.354 ; 35.877,38.127 29.387,38.127 ; U3.6@41.504,36.304 41.504,34.181 41.45,34.127 41.45,32.554 42.504,31.5 v1(44.75,31.5) 46.5,31.5 48.25,33.25 D5.2
  Bottom Layer w0.2: J4.6@31.377,2.127 31.377,4.414 35.656,8.693 41.906,8.693 44.037,10.824 44.037,15.127 45.127,16.217 45.127,30.377 44.704,30.8 44.704,31.454 v1(44.75,31.5)
3V8: C5.1 D4.2 P2.1 R11.1 U4.6 | length 16.6
  Top Layer w0.2: D4.2@13.127,9.577 14.827,7.877 16.897,7.877 18.897,9.877 18.897,14.747 18.904,14.754 17.854,14.754 17.054,15.554 17.054,15.754 17.054,17.729 17.029,17.754 U4.6@17.004,17.754
BATT+: C2.2 C8.2 J2.3 U2.2 U2.3 U5.10 | length 41.9
  Top Layer w0.15: U5.10@16.285,34.377 v1(17.377,34.377)
  Top Layer w0.2: J2.3@7.877,35.627 10.627,35.627 11.589,36.589 11.589,37.589 12,38 12.675,38 v1(12.75,37.925) ; v1(17.377,34.377) 17.711,34.377 18.011,34.677 19.527,34.677 19.627,34.577 C8.2@19.627,34.377 ; v1(19.377,27.377) 19.377,27.444 19,27.821 19,34.26 19.117,34.377 C8.2@19.627,34.377 ; C8.2@20.127,34.302 20.052,34.377 C8.2@19.627,34.377 ; C2.2@24.25,21.8 v1(24.25,23.25) 24.25,25 ; U2.3 24.25,25 ; U2.2 24.75,25.5 24.25,25
  Bottom Layer w0.2: v1(12.75,37.925) 12.825,38 16.254,38 17.377,36.877 v1(17.377,34.377) ; v1(19.377,27.377) 19.377,23.627 19.754,23.25 v1(24.25,23.25)
BATT-: C9.2 J2.2 R14.2 U5.6 U5.11 | length 11
  Top Layer w0.15: R14.2 13.932,35.1 14.235,34.797 14.665,34.797 14.7,34.763 U5.6 14.715,34.535 14.715,35.015 15.45,35.75 U5.11
  Top Layer w0.2: J2.2 10.7,33.75 C9.2@11.75,32.7 ; C9.2 C9.2@11.75,32.7 ; R14.2 11.75,33.85 C9.2@11.75,32.7
BATT_NTC: J2.1 R5.2 U2.1 U5.2 | length 34.6
  Top Layer w0.15: J2.1@7.877,31.627 10.127,31.627 10.877,30.877 15.927,30.877 17.677,32.627 17.677,33.427 17.783,33.533 17.868,33.533 18.25,33.915 v1(18.25,34) ; U5.2 15.915,36.995 15.915,37.458 16.584,38.127 v1(17.377,38.127) ; v1(24.25,26) U2.1
  Bottom Layer w0.15: v1(17.377,38.127) 18.25,37.254 v1(18.25,34) 18.279,33.971 18.279,33.225 19.127,32.377 20.877,32.377 22.877,30.377 22.877,27.877 22.052,27.052 22.052,26.139 22.389,25.802 23.16,25.802 23.358,26 v1(24.25,26)
CHG_OUT: C3.2 C4.1 C6.2 D2.2 D3.2 U2.10 U2.11 U3.2 U3.3 U4.1 U4.10 | length 74.2
  Top Layer w0.2: U4.1@15.354,19.754 17.004,19.754 17.279,19.754 20.529,23.004 22.004,23.004 22.654,23.654 22.654,24.754 22.75,24.85 v1(22.75,26.5) ; v1(28.25,13) D3.2 ; U2.11 29.6,25.5 v1(30.254,26.154) 30.254,25.254 ; U2.10@28.939,25.069 30.069,25.069 30.254,25.254 ; D2.2@35.127,23.677 34.904,23.454 32.254,23.454 31.054,23.454 30.254,24.254 30.254,25.254 ; v1(38.75,41) 40.104,41 40.627,40.477 40.627,39.377 40.877,39.127 41.377,39.127 ; U3.3@41.504,38.204 41.504,39 41.377,39.127 ; U3.2@42.004,38.204 42.004,39 41.877,39.127 41.377,39.127
  Bottom Layer w0.2: v1(22.75,26.5) 22.85,26.5 24.236,27.886 28.236,27.886 28.736,27.386 29.24,27.386 30.177,26.449 30.177,26.231 v1(30.254,26.154) ; v1(28.25,13) 29.25,14 29.25,18.65 30.378,19.778 30.378,25.922 30.331,25.969 30.331,26.112 v1@30.373,26.154 ; v1@30.378,26.163 34.513,26.163 38.859,30.509 38.859,40.782 38.75,40.892 v1(38.75,41)
FG_ALRT: P1.3 U5.8 | length 7.9
  Top Layer w0.15: v1(15.25,31.75) 15.25,33.089 15.5,33.339 U5.8
  Bottom Layer w0.15: v1(15.25,31.75) 15.27,31.73 P1.3@15.27,26.774
FG_SCL: P1.2 U5.3 | length 19.1
  Top Layer w0.15: U5.3 15.5,38.25 v1(16,38.75)
  Bottom Layer w0.15: P1.2@12.837,26.627 12.837,27.917 10.877,29.877 10.877,37.127 12.25,38.5 14.813,38.5 15.063,38.75 v1(16,38.75)
FG_SDA: P1.1 U5.4 | length 19.1
  Top Layer w0.15: U5.4 15.1,39.228 15.25,39.378 v1(15.25,39.5)
  Bottom Layer w0.15: P1.1@10.057,26.627 10.057,29.057 10.377,29.377 10.377,37.127 12.25,39 14.096,39 14.596,39.5 v1(15.25,39.5)
GND: C1.2 C2.1 C3.1 C4.2 C5.2 C6.1 C7.1 C8.1 D1.2 J1.A1_B12 J1.A8 J1.B1_A12 J1.B8 J1.SH1 J1.SH2 J1.SH3 J1.SH4 J2.4 J2.5 J4.4 J5.5 P2.2 P3.2 P4.2 P5.2 P6.2 pad.3 pad.6 pad.7 pad.MNT R1.2 R2.2 R6.2 R7.2 R8.2 R9.2 R13.2 R14.1 U1.3 U2.8 U2.17 U2.18 U2.19 U2.20 U2.21 U2.22 U3.1 U3.4 U3.5 U3.9 U4.2 U4.3 U4.8 U5.5 | length 135.6
  Top Layer w0.15: J2.4@2.327,29.277 2.327,37.977 8.777,37.977 9.5,37.254 v1(9.5,37.25) ; U5.5 14.7,36.76 14.665,36.725 14.233,36.725 13.908,36.4 R14.1 13,37.362 13.325,37.687 13.325,39.825 13.75,40.25 P4.2 ; R7.2@25.377,32.004 25.426,32.052 27.452,32.052 27.627,32.227 29.804,32.227 R6.2@29.877,32.154 ; U2.17@28.084,24.739 28.084,24.671 28.216,24.539 28.216,23.922 U2.8@28.254,23.884 ; R6.2@29.877,32.227 29.877,33.2 31.397,34.72 33.054,34.72 P6.2@33.127,34.647 ; D1.2@37.75,20.51 38.74,20.51 v1(39.75,19.5) 40.25,19 41.75,19 42.75,18 R1.2 ; U3.5@41.004,36.304 41.004,36.779 41.029,36.804 41.029,36.929 U3.9@41.354,37.254 ; v1(41.25,26) 41.75,25.5 J1.A8 ; U3.9@42.154,37.254 42.479,37.579 42.479,37.704 42.504,37.729 U3.1@42.504,38.204 ; J1.B1_A12@42.372,27.507 42.372,28.177 42.709,28.515 J1.SH2@42.765,28.515 ; J1.A1_B12 42.495,20.323 42.888,19.93 J1.SH1 44.93,19.93 45,20 ; J1.B8 43.5,22.5 45,21 45,20 ; R2.2 47.1,16.4 46.75,16.75 44.5,16.75 44.2,17.05 44.2,18.7 45,19.5 45,20
  Top Layer w0.2: U4.2 14.25,19.25 ; C5.2 15.45,11.03 P2.2 ; U4.8 U4.3 14.75,18.75 14.25,19.25 ; C6.1@20.854,24.754 20.781,24.827 14.827,24.827 v1(14.25,24.25) 13.814,23.814 13.814,19.686 14.25,19.25 ; C6.1@20.854,24.827 20.854,29.177 20.127,29.904 20.127,32.452 21.302,32.452 21.775,31.979 25.352,31.979 R7.2@25.377,32.004 ; v1(21.25,21.75) 22.554,21.75 22.677,21.627 22.677,20.427 24.227,18.877 24.377,18.877 R13.2@24.377,17.127 ; U2.8@28.254,23.884 28.254,22.75 28.427,22.577 28.923,22.577 v1(29,22.5) ; v1(32.25,27.25) 32.25,25.283 32.279,25.254 32.702,25.677 C1.2@35.127,25.677 ; P6.2@33.127,34.647 33.2,34.72 38.534,34.72 C7.1@38.627,34.627 ; U1.3 40.967,26.175 41.142,26 v1(41.25,26) ; U3.5@41.004,36.304 40.317,36.304 40.2,36.421 40.2,38.087 40.317,38.204 U3.4@41.004,38.204 ; C4.2@42.027,40.877 42.504,40.4 U3.1@42.504,38.204
  Bottom Layer w0.2: v1(21.25,21.75) 22,22.5 v1(29,22.5)
  other v2: 41.35,37.25 42.15,37.25
IMU_INT: J3.3 J4.1 | length 23.5
  Top Layer w0.2: J3.3@24.984,5.354 24.984,3.524 25.754,2.754 27.547,2.754 30.047,5.254 40.91,5.254 J4.1@44.037,2.127
IMU_SCL: J3.7 J4.3 | length 21.1
  Top Layer w0.2: J3.7@22.444,5.354 22.444,3.314 24.004,1.754 28.254,1.754 30.754,4.254 36.83,4.254 J4.3@38.957,2.127
IMU_SDA: J3.5 J4.2 | length 22.4
  Top Layer w0.2: J3.5@23.714,5.354 23.714,3.294 24.754,2.254 27.754,2.254 30.254,4.754 38.79,4.754 41.417,2.127 J4.2@41.497,2.127
NetC9_1: C9.1 U5.7 | length 3.2
  Top Layer w0.15: C9.1 14,32.5 15.1,33.6 U5.7
NetD2_1: D2.1 R3.2 | length 4.4
  Top Layer w0.2: R3.2@32.254,19.701 34.451,19.701 35.127,20.377 D2.1@35.127,21.577
NetD3_1: D3.1 R4.2 | length 2.1
  Top Layer w0.2: D3.1 R4.2
NetD4_1: D4.1 R10.1 | length 2.4
  Top Layer w0.15: D4.1 R10.1
NetD5_1: D5.1 R12.1 | length 2.7
  Top Layer w0.2: R12.1@45.627,36.977 46.527,36.977 47.077,36.427 D5.1@48.127,36.427
NetJ1_A5: J1.A5 R1.1 | length 7.1
  Top Layer w0.15: J1.A5 43.75,23 45.85,20.9 R1.1
NetJ1_B5: J1.B5 R2.1 | length 11.1
  Top Layer w0.15: J1.B5 43.567,26 48.5,21.067 48.5,19 48.25,18.75 R2.1
NetJ3_4: J3.4 U2.6 | length 15.6
  Top Layer w0.2: J3.4@24.984,9.254 24.984,13.984 26.754,15.754 26.754,22.254 27.254,22.754 U2.6@27.254,23.884
NetJ3_6: J3.6 U2.5 | length 15.8
  Top Layer w0.2: J3.6@23.714,9.254 23.714,13.39 26.254,15.93 26.254,22.754 26.75,23.25 U2.5
NetJ3_8: J3.8 U2.4 | length 17
  Top Layer w0.2: J3.8@22.444,9.254 22.444,12.944 25.5,16 25.5,24.353 25.617,24.47 26.035,24.47 U2.4
NetL1_1: L1.1 U3.7 | length 3
  Top Layer w0.2: U3.7@42.004,36.304 42.029,36.279 42.029,35.975 42.627,35.377 43.187,35.377 43.304,35.26 L1.1@43.304,34.127
NetL2_1: L2.1 U4.9 | length 2.7
  Top Layer w0.2: U4.9@17.004,19.254 L2.1@19.754,19.254
NetL2_2: L2.2 U4.7 | length 3.1
  Top Layer w0.2: U4.7@17.004,18.254 17.785,18.254 18.285,17.754 19.402,17.754 L2.2@19.754,17.402
NetR3_1: R3.1 U2.9 | length 5.7
  Top Layer w0.2: U2.9 29.235,24.5 30.254,23.481 30.254,21.754 30.754,21.254 R3.1@32.254,21.254
NetR4_1: R4.1 U2.7 | length 3.3
  Top Layer w0.2: U2.7@27.754,23.884 27.754,22.517 28.127,22.144 R4.1@28.127,20.727
NetR5_1: R5.1 U5.9 | length 1.9
  Top Layer w0.15: U5.9 15.9,33.778 16.15,33.528 R5.1
NetR6_1: R6.1 U2.12 | length 5.3
  Top Layer w0.2: U2.12 29.203,26 29.233,26.03 29.233,26.483 30,27.25 R6.1
NetR7_1: R7.1 U2.15 | length 4.3
  Top Layer w0.2: R7.1@25.377,30.25 25.377,29.377 27.254,27.5 U2.15@27.254,26.754
NetR8_1: R8.1 U2.14 | length 3.8
  Top Layer w0.2: R8.1@27.627,30.527 27.754,30.4 U2.14@27.754,26.754
NetR9_1: R9.1 U2.16 | length 6.3
  Top Layer w0.2: R9.1@22.877,30.377 22.877,29.377 23.627,28.627 25.377,28.627 26.724,27.28 26.724,26.784 U2.16@26.754,26.754
NetR10_2: R10.2 U4.5 | length 3.5
  Top Layer w0.2: R10.2@13.127,15.877 13.233,15.983 13.233,16.483 13.25,16.5 13.25,16.85 14.154,17.754 U4.5@15.354,17.754
NetR11_2: R11.2 R13.1 U4.4 | length 20.1
  Top Layer w0.2: v1(13.5,18.73) 13.976,18.254 U4.4@15.354,18.254 ; R11.2@20.604,14.754 22.254,14.754 22.904,15.404 R13.1@22.904,17.25 ; v1(22,18.75) 22.9,17.85 R13.1
  Bottom Layer w0.2: v1(13.5,18.73) 13.5,19.75 14.627,20.877 21.377,20.877 22,20.254 v1(22,18.75)
NetR12_2: R12.2 U3.8 | length 3.6
  Top Layer w0.2: U3.8 43.704,36.3 44.727,35.277 R12.2@45.627,35.277
USB_5V: C1.1 F1.2 P6.1 U2.13 | length 16.5
  Top Layer w0.2: U2.13@28.254,26.754 28.254,28.254 28.423,28.423 28.923,28.423 v1(29,28.5) ; P6.1 33.25,29.504 33.5,29.254 33.5,27.704 34.127,27.077 35.127,27.077 36.077,27.077 36.477,27.477 36.477,27.61 36.594,27.727 F1.2@37.627,27.727
  Bottom Layer w0.2: v1(29,28.5) 32.75,28.5 v1(33.5,27.75)
USB_D+: J1.A6 J1.B6 J3.2 U1.1 | length 34.7
  Top Layer w0.2: J3.2@26.254,9.254 26.254,8.984 26.484,8.754 v1(27.754,8.754) ; U1.1 39.65,24.68 39.75,24.58 v1(39.75,23.75) ; J1.A6 41.617,24 41.5,24.117 41.5,24.883 41.617,25 43.651,25 44.024,24.627 v1(44.127,24.627)
  Bottom Layer w0.2: v1(27.754,8.754) 31.004,8.754 35,12.75 35,16.5 39.754,21.254 39.754,23.746 v1(39.75,23.75) 40.627,24.627 v1(44.127,24.627)
USB_D-: J1.A7 J1.B7 J3.1 U1.2 | length 32.3
  Top Layer w0.2: J3.1@26.254,5.354 26.254,5.524 26.484,5.754 v1(27.754,5.754) ; U1.2 40.35,23.949 40.75,23.549 v1(40.75,23.5) J1.B7 42.545,23.55 43.194,23.55 43.37,23.726 43.37,24.274 43.194,24.45 42.545,24.45 J1.A7
  Bottom Layer w0.2: v1(27.754,5.754) 29.754,5.754 37.5,13.5 37.5,16 37.825,16.325 40.75,19.25 v1(40.75,23.5)
VBUS: D1.1 F1.1 J1.A4_B9 J1.B4_A9 | length 13.2
  Top Layer w0.2: J1.A4_B9@42.372,21.907 40.097,21.907 38.427,23.577 37.627,23.577 37.627,25.527 37.877,25.527 39.6,27.25 41,27.25 41.543,26.707 J1.B4_A9@42.495,26.707
pads on no net: J1. J4.5 J5.1 J5.2 J5.3 J5.4 U5.1

## Polygon pours and split planes (outlines as drawn)
GND on Bottom Layer "GND_L02_P000" (solid, pour order 0): 6.627,42.377 47.877,42.377 49.377,40.877 49.377,1.627 48.377,0.627 15.877,0.627 6.627,9.877

## Silkscreen, mask and mechanical layers (free items; w line width, h text height)
Top Overlay:
  lines w0.254: 0.627,15.877 0.627,23.627 9.127,23.627 9.127,9.877 6.627,9.877 0.627,15.877
  text "s4584081 / METR4911 / 2026" at 2.627,23.627 h1.25 r270
  text "Adafruit / ICM-20948" at 32.877,7.377 h1.2
Mechanical 1:
  lines w0.254: 0.127,15.627 0.127,41.357 cw(c1.397,41.357) 1.397,42.627 48.627,42.627 cw(c48.627,41.377) 49.877,41.377 49.877,1.627 49.877,1.397 cw(c48.607,1.397) 48.607,0.127 15.627,0.127 0.127,15.627 ; 29.75,2.254 45.254,2.254 45.254,15.25 29.75,15.25 29.75,2.254

## Text inside footprints (layer, text, board x,y; h text height)
J1: Mechanical 13 "PCB EDGE" at 49.75,29.65 h0.41 r90